# Allegro board MB1167.brd
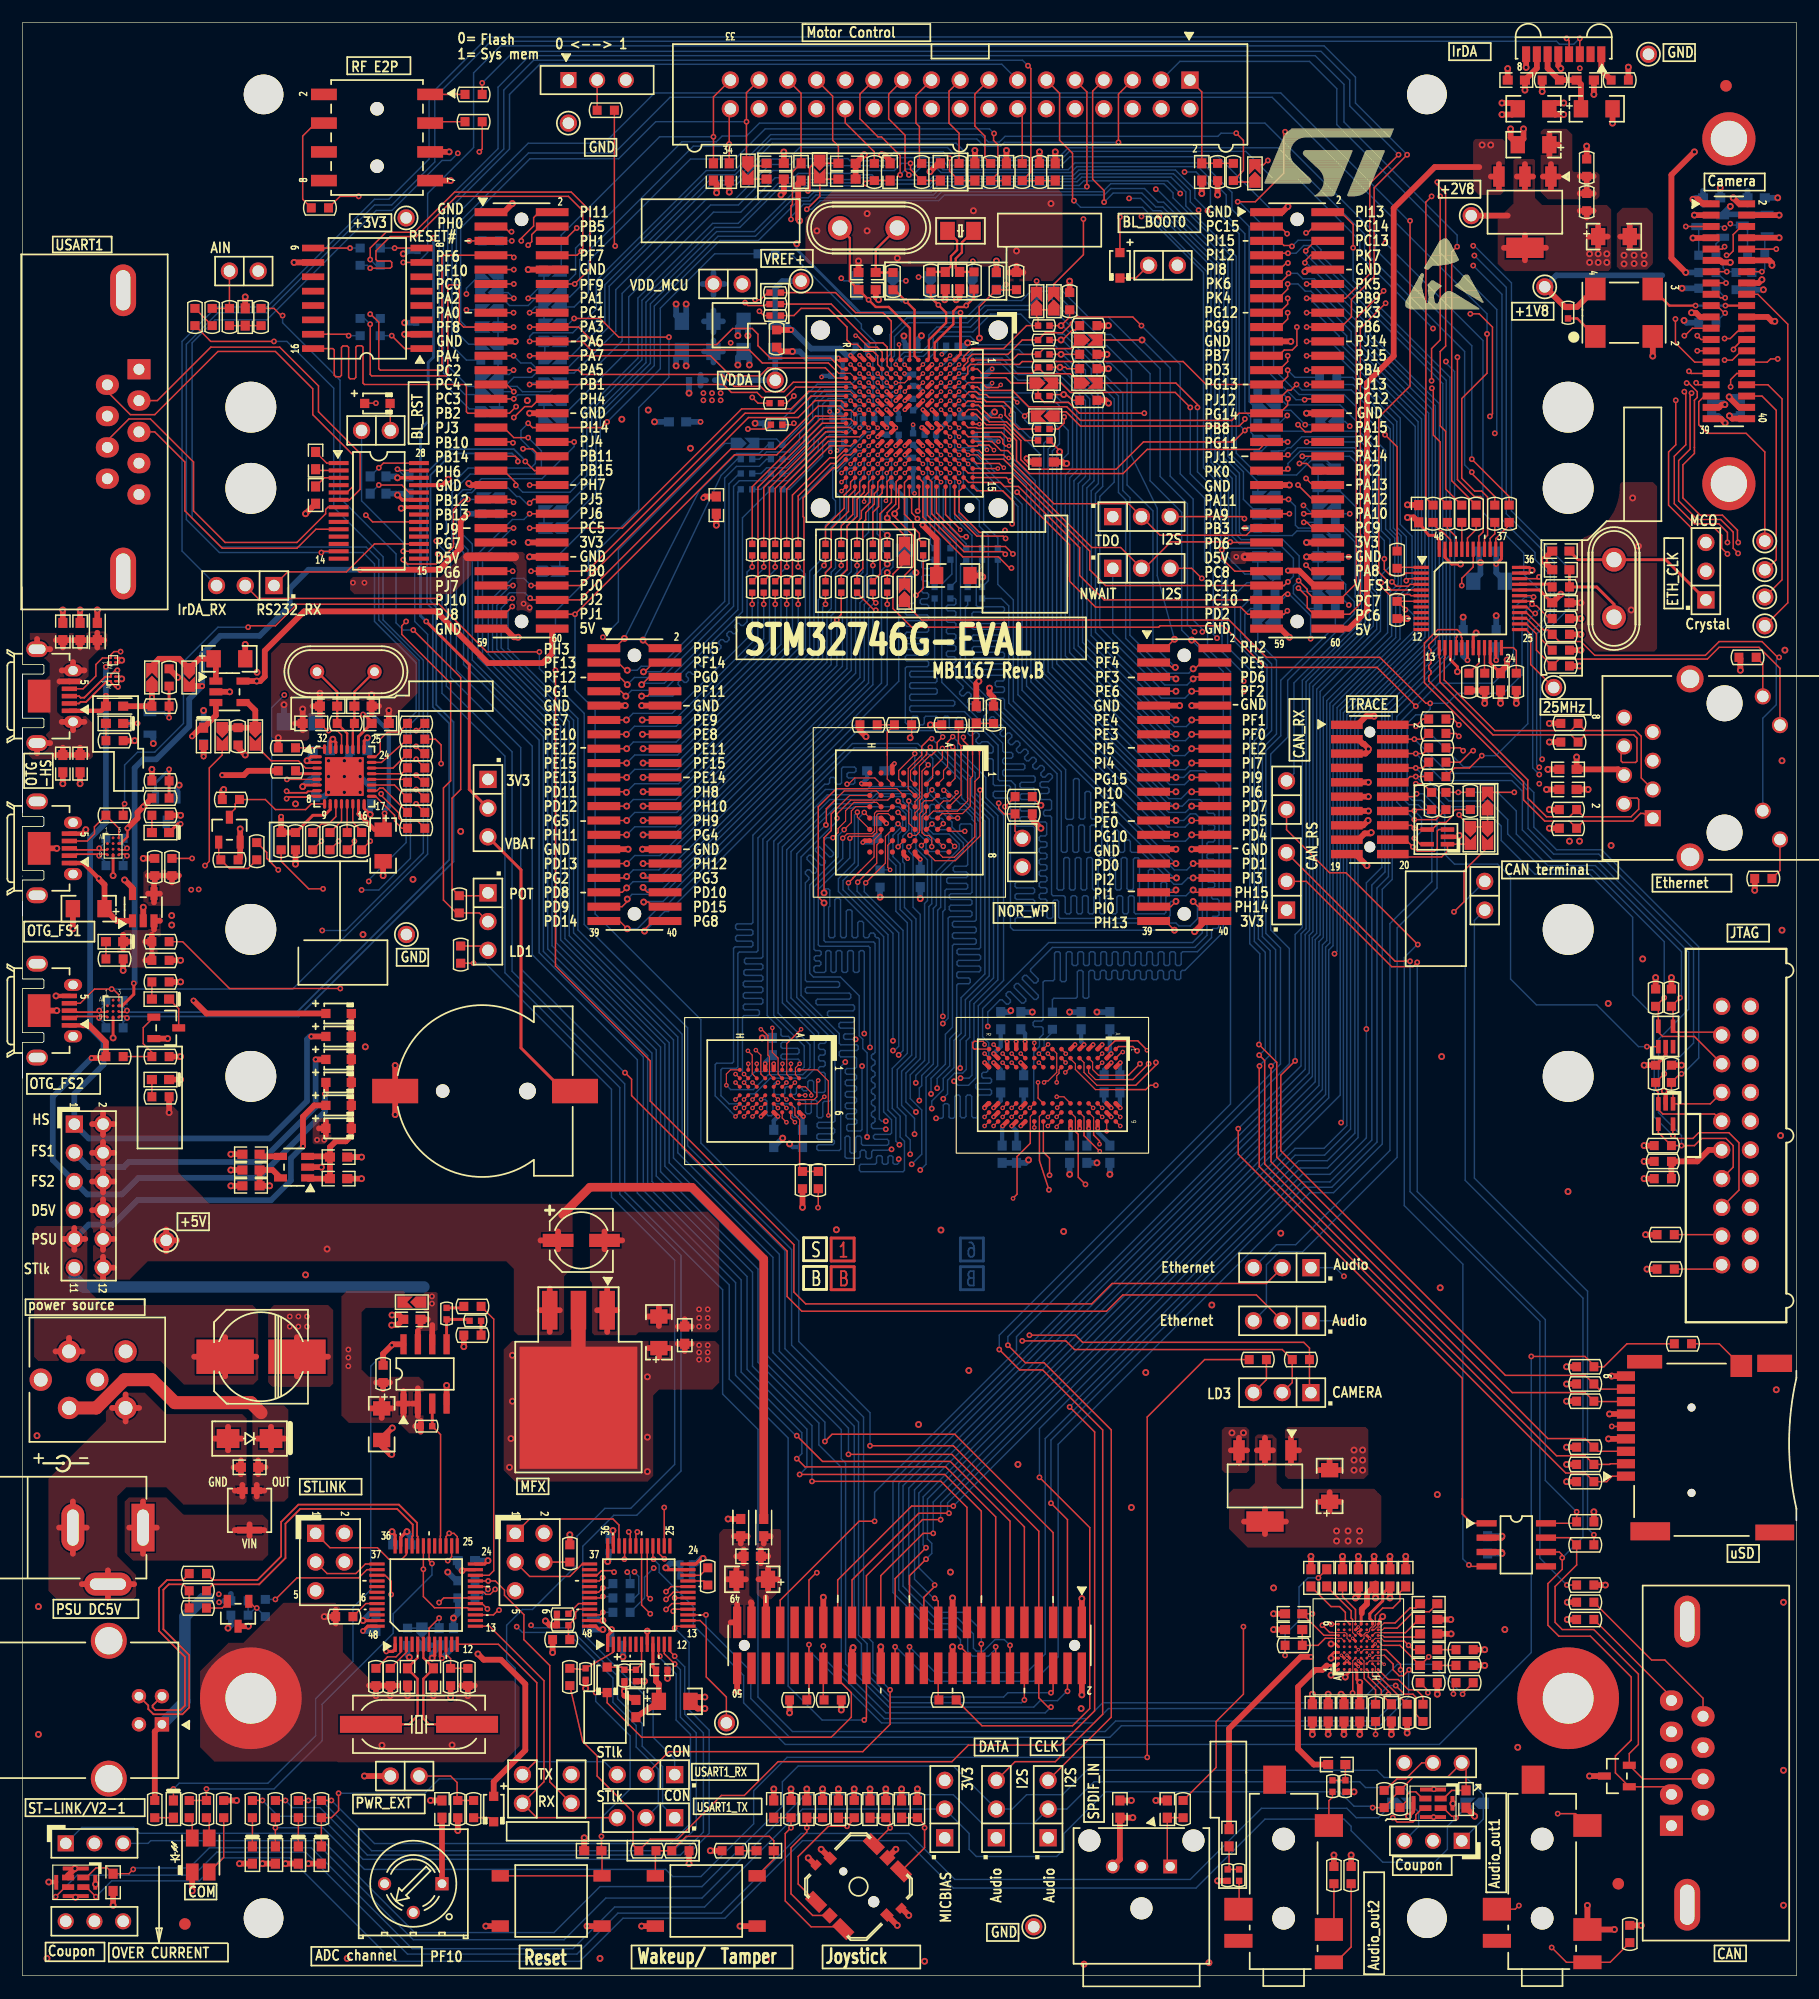
[diagram p0: board, top side]
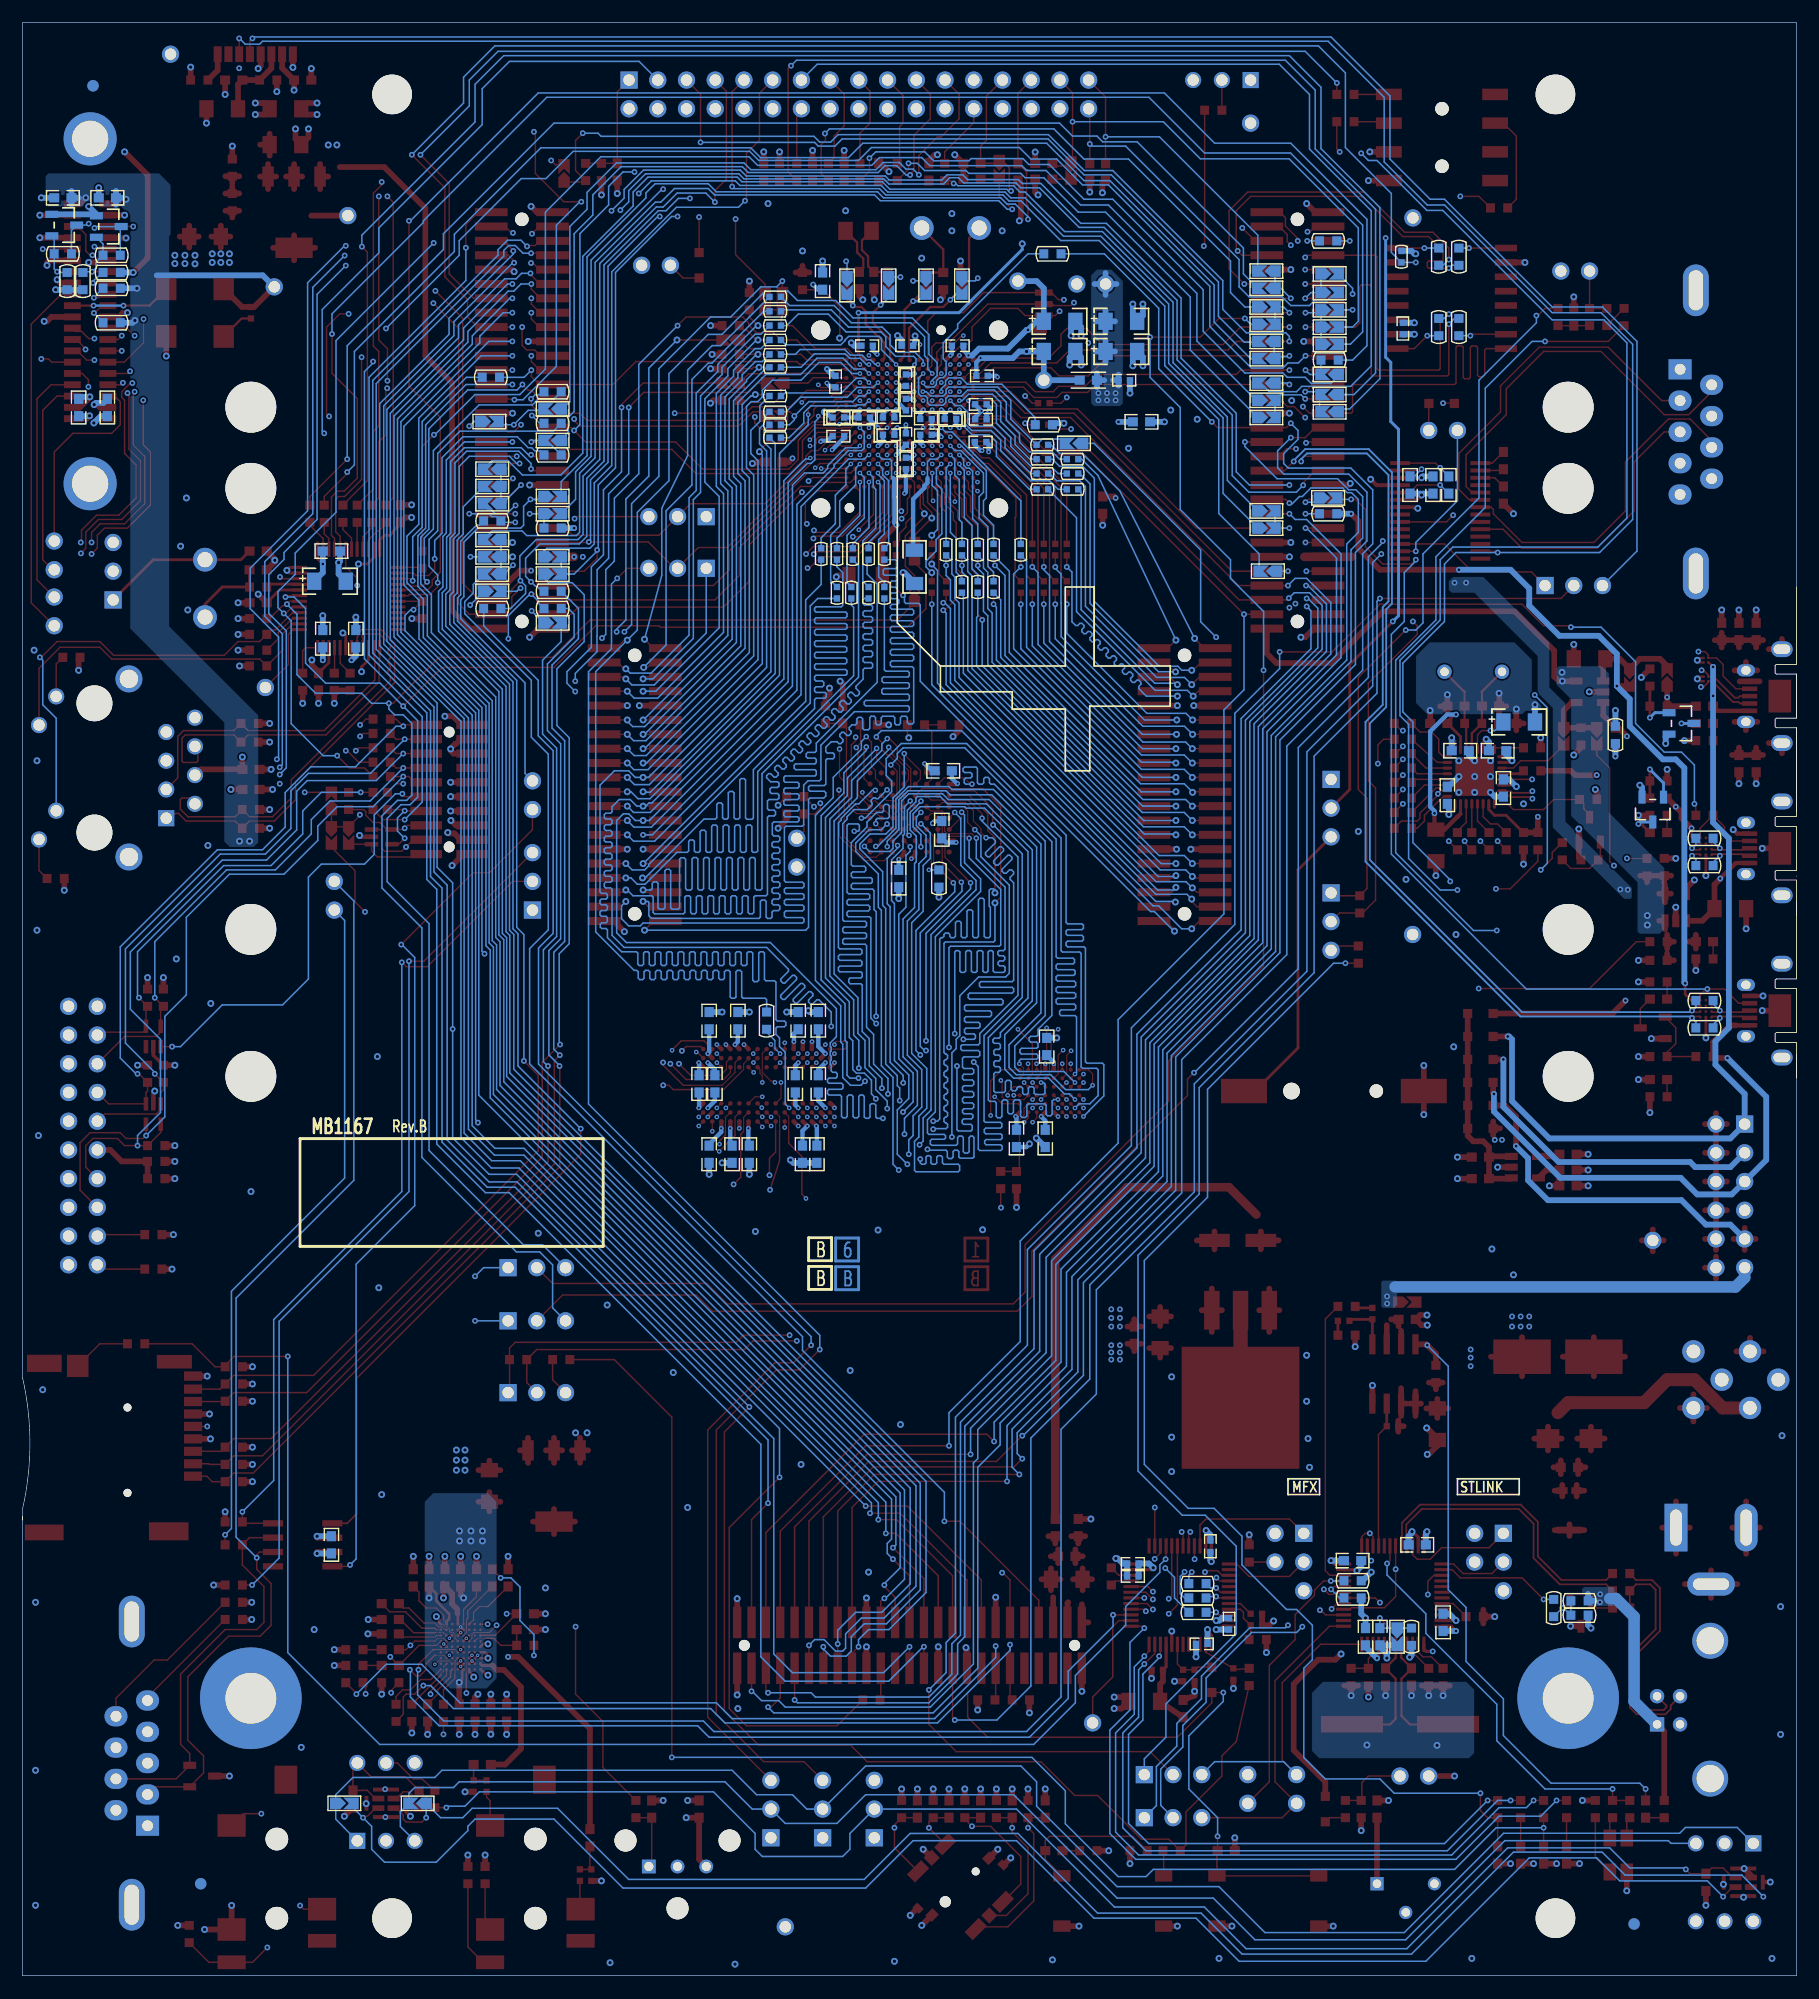
[diagram p1: board, bottom side, seen from below]

Outline 156.84 x 172.72 mm; copper layers: TOP, L2_GND, L3_VCC, L4_SIG, L5_GND, BOTTOM. Coordinates in mm from the lower left corner of the outline.
Outline path: 0,115.14 0,111.25 ; 0,110.36 0,102.87 ; 0,97.26 0,97.21 ; 0,172.72 156.84,172.72 156.84,52.86 arc(156.2,47.08) 156.84,41.3 156.84,40.28 156.84,40.59 156.84,0 0,0 0,81.53 0,79.38 0,82.54 1.79,82.54 1.89,82.64 1.89,83.29 1.79,83.39 0,83.39 0,87.29 1.79,87.29 1.89,87.39 1.89,88.04 1.79,88.14 0,88.14 0,95 0,93.73 0,96.89 1.79,96.89 1.89,96.99 1.89,97.64 1.79,97.75 0,97.75 0,101.64 1.79,101.64 1.89,101.75 1.89,102.4 1.79,102.5 0,102.5 0,109.35 0,107.19 0,110.36 1.79,110.36 1.89,110.46 1.89,111.11 1.79,111.21 0,111.21 0,115.11 1.79,115.11 1.89,115.21 1.89,115.86 1.79,115.96 0,115.96 0,172.72

## Design rules (mm)
net group A0: nets A0 NETR242_1
net group A1: nets A1 NETR240_1
net group A2: nets A2 NETR239_1
net group A3: nets A3 NETR236_1
net group A4: nets A4 NETR233_1
net group A5: nets A5 NETR232_1
net group A6: nets A6 NETR255_1
net group A7: nets A7 NETR253_1
net group A8: nets A8 NETR256_1
net group A9: nets A9 NETR266_1
net group A10: nets A10 NETR258_1
net group A11: nets A11 NETR257_1
net group A12: nets A12 NETR272_1
net group A13: nets A13 NETR262_1
net group A14: nets A14 NETR273_1
net group A15: nets A15 NETR264_1
net group A16: nets A16 NETR265_2
net group A17: nets A17 NETR274_1
net group A18: nets A18 NETR263_1
net group A19: nets A19 NETR37_1
net group A20: nets A20 NETR35_1
net group A21: nets A21 NETR31_1
net group A22: nets A22 NETR34_1
net group BOOT0: nets BOOT0 NETR4_2
net group D0: nets D0 NETR72_1
net group D1: nets D1 NETR60_1
net group D2: nets D2 NETR267_1
net group D3: nets D3 NETR276_1
net group D4: nets D4 NETR63_1
net group D5: nets D5 NETR53_1
net group D6: nets D6 NETR52_1
net group D7: nets D7 NETR64_1
net group D8: nets D8 NETR54_1
net group D9: nets D9 NETR65_1
net group D10: nets D10 NETR67_1
net group D11: nets D11 NETR55_1
net group D12: nets D12 NETR66_1
net group D13: nets D13 NETR59_1
net group D14: nets D14 NETR70_1
net group D15: nets D15 NETR71_1
net group D16: nets D16 NETR56_2
net group D17: nets D17 NETR57_2
net group D18: nets D18 NETR68_2
net group D19: nets D19 NETR69_2
net group D20: nets D20 NETR58_2
net group D21: nets D21 NETR271_2
net group D22: nets D22 NETR279_2
net group D23: nets D23 NETR278_2
net group D24: nets D24 NETR270_2
net group D25: nets D25 NETR269_2
net group D26: nets D26 NETR268_2
net group D27: nets D27 NETR277_2
net group D28: nets D28 NETR250_2
net group D29: nets D29 NETR245_2
net group D30: nets D30 NETR246_2
net group D31: nets D31 NETR248_2
net group DIFFPAIR1: nets NETCN9_2 NETCN9_3
net group NETC11_1: nets NETC11_1 NETCN1_26
net group NETC12_2: nets NETC12_2 NETCN1_19
net group NETC13_2: nets NETC13_2 NETCN1_17
net group NETC14_2: nets NETC14_2 NETCN1_15
net group NETC15_1: nets NETC15_1 NETCN1_14
net group NETC16_2: nets NETC16_2 PA6
net group NETC20_1: nets NETC20_1 PH0
net group NETC21_1: nets NETC21_1 PC15
net group NETC22_1: nets NETC22_1 PC14
net group NETC25_1: nets NETC25_1 NETC25_2
net group NETC31_2: nets NETC31_2 NETR73_1
net group NETC38_1: nets NETC38_1 NETC39_1
net group NETC71_1: nets NETC71_1 NETC71_2
net group NETC76_1: nets NETC76_1 NETC76_2
net group NETC77_1: nets NETC77_1 NETC77_2
net group NETC97_1: nets NETC97_1 PG12
net group NETC136_1: nets NETC136_1 NETC136_2
net group NETCN12_2: nets NETCN12_2 PA13
net group NETCN12_4: nets NETCN12_4 PA14
net group NETCN12_8: nets NETCN12_8 PA15
net group NETCN13_2: nets NETCN13_2 PA11
net group NETCN13_3: nets NETCN13_3 NETD5_C3
net group NETCN13_4: nets NETCN13_4 PA10
net group NETCN14_3: nets NETCN14_3 PB15
net group NETCN16_2: nets NETCN16_2 PAR_D4
net group NETCN16_8: nets NETCN16_8 PAR_D3
net group NETCN16_10: nets NETCN16_10 NETR154_1
net group NETCN20_22: nets NETCN20_22 PK7
net group NETCN21_2: nets NETCN21_2 STL_USB_DM
net group NETCN22_7: nets NETCN22_7 NETJP12_1
net group NETD15_2: nets NETD15_2 NETJP15_2
net group NETJP19_3: nets NETJP19_3 PAR_D1
net group NETLD1_2: nets NETLD1_2 NETR207_1
net group NETLD2_2: nets NETLD2_2 NETR206_1
net group NETLD3_2: nets NETLD3_2 NETR205_1
net group NETLD4_2: nets NETLD4_2 NETR204_1
net group NETLD6_2: nets NETLD6_2 NETR121_1
net group NETR42_1: nets NETR42_1 PB2
net group NETR43_1: nets NETR43_1 PB6
net group NETR44_1: nets NETR44_1 PG15
net group NETR45_1: nets NETR45_1 PH7
net group NETR46_1: nets NETR46_1 NETR46_2
net group NETR47_1: nets NETR47_1 NETR47_2
net group NETR48_1: nets NETR48_1 NETR48_2
net group NETR49_1: nets NETR49_1 NETR49_2
net group NETR50_1: nets NETR50_1 NETR50_2
net group NETR51_1: nets NETR51_1 PF11
net group NETR61_1: nets NETR61_1 PG8
net group NETR62_1: nets NETR62_1 NETR62_2
net group NETR88_1: nets NETR88_1 PA3
net group NETR90_1: nets NETR90_1 PD7
net group NETR95_1: nets NETR95_1 PB0
net group NETR100_1: nets NETR100_1 PB1
net group NETR102_1: nets NETR102_1 PB10
net group NETR106_1: nets NETR106_1 PB11
net group NETR107_1: nets NETR107_1 PD5
net group NETR109_1: nets NETR109_1 PB12
net group NETR119_1: nets NETR119_1 PB5
net group NETR123_1: nets NETR123_1 PH4
net group NETR124_1: nets NETR124_1 PI11
net group NETR125_1: nets NETR125_1 PC0
net group NETR126_1: nets NETR126_1 PA5
net group NETR146_1: nets NETR146_1 PG10
net group NETR193_1: nets NETR193_1 PG9
net group NETR225_2: nets NETR225_2 PI14
net group NETR241_2: nets NETR241_2 PC2
net group NETR243_2: nets NETR243_2 PG13
net group NETR244_2: nets NETR244_2 PG14
net group NETR251_2: nets NETR251_2 PH3
net group NETR252_2: nets NETR252_2 PG11
net group NETR254_2: nets NETR254_2 PH5
net group NETR287_1: nets NETR287_1 PH2
net group NETR295_2: nets NETR295_2 PI8
net group VDDA: nets VDDA VREF+
net group +1V8: nets NETR25_1
net group +2V8: nets I2C1_SCL_C I2C1_SDA_C NETCN2_3 NETR195_2 NETR290_2 PB8
net group +3V3_ST_LINK: nets +3V3_ST_LINK NETLD12_4 STM_RST
net group +5V: nets NETLD10_1
net group A23: nets A23 NETR39_1 NETR247_1
net group ADDRESS: nets NETR285_1
net group CUR_SEL: nets CUR_SEL NETR150_2 NETR151_2 NETR152_1
net group DATA: nets PE0 PE1 PI4 PI5
net group LED_STLINK: nets LED_STLINK NETLD12_2 NETLD12_3
net group MIC_VDD: nets MIC_VDD NETCN24_5 NETR199_1
net group NETB2_2: nets NETB2_2 NETR180_1 PC13
net group NETC24_2: nets NETC24_2 NETCN3_1 NETJP24_1 NETR27_1 NETR27_2
net group NETC64_1: nets NETC64_1 NETC64_2 NETC74_2
net group NETC88_1: nets NETC88_1 NETC88_2 NETCN25_6
net group NETC98_1: nets NETC98_1 NETC98_2 NETCN25_4
net group NETCN2_1: nets NETCN2_1 NETR189_2 NETR291_2 PB9
net group NETCN12_10: nets NETCN5_5 NETCN12_10 NETR127_1 RESET#
net group NETCN12_14: nets NETCN12_6 NETCN12_14 T_JTDO
net group NETCN12_16: nets NETCN12_16 NETCN15_3 PB4
net group NETCN14_2: nets NETCN14_2
net group NETCN16_1: nets NETCN2_4 NETCN16_1 PAR_D8
net group NETCN21_3: nets NETCN21_3 NETR171_2 STL_USB_DP
net group NETL2_1: nets NETL2_1 NETR80_2 NETR103_1
net group NETLD8_2: nets NETR132_1
net group NETLD11_2: nets NETLD11_2 NETR293_1 PWR_ENN USB_RENUMN VUSB_ST_LINK
net group NETR105_2: nets NETR105_2 PA9 VBUS_FS1
net group NETR115_1: nets NETR115_1 NETR138_2 PB13 VBUS_FS2
net group NETR129_2: nets NETR130_2
net group NETR227_1: nets NETR26_1 NETR227_1 PF9
net group NETR228_2: nets NETR22_1 NETR228_2 PF7
net group NETR237_1: nets NETR24_1 NETR237_1 PF6
net group NETR238_2: nets NETR41_1 NETR238_2 PF8

## Placement (name value [footprint] x y rotation side)
B1  TD-0341 [RESET_Black]  [PB10]  46.74 6.6 0 top
B2  WKUP_TAMPER  [PB10]  60.45 6.6 0 top
B3  EVQQ7  [SW-JOY]  73.91 7.87 45 top
BT1  CR1220 holder  [BAT_2SM_CR1220]  40.89 78.23 180 top
C1  100nF  [0603C]  132.08 167.64 180 top
C2  100nF  [0603C]  138.18 167.64 0 top
C3  4.7uF  [TAN-A]  133.6 165.1 0 top
C4  4.7uF  [TAN-A]  139.19 165.1 180 top
C5  10uF  [TAN-A]  133.6 161.93 0 top
C6  [N_A]  [0603C]  66.55 160.27 180 top
C7  [N_A]  [0603C]  72.9 160.27 180 top
C8  [N_A]  [0603C]  61.09 159.51 90 top
C9  [N_A]  [0603C]  62.48 159.51 90 top
C10  [N_A]  [0603C]  68.83 159.51 90 top
C11  100nF  [0603C]  76.71 159.51 90 top
C12  [N_A]  [0603C]  81.15 159.51 270 top
C13  [N_A]  [0603C]  84.2 159.51 270 top
C14  [N_A]  [0603C]  87 159.51 270 top
C15  100nF  [0603C]  91.31 159.51 90 top
C16  1nF  [0603C]  104.27 159.51 90 top
C17  10nF  [0603C]  66.55 158.88 0 top
C18  [N_A]  [0603C]  72.9 158.88 180 top
C19  10uF  [TAN-A]  140.72 153.8 180 top
C20  20pF  [0603C]  74.68 150.62 180 top
C21  1.5pF  [0603C]  81.58 149.91 270 top
C22  1.5pF  [0603C]  82.85 149.91 270 top
C23  20pF  [0603C]  74.68 149.1 0 top
C24  [N_A]  [0603C]  19.68 146.69 270 top
C25  100nF  [0603C]  25.91 133.99 270 top
C26  [N_A]  [0603C]  90.42 133.86 180 top
C27  100nF  [0603C]  25.91 130.94 90 top
C28  [N_A]  [0603C]  61.34 130.05 90 top
C29  100nF  [0603C]  123.44 129.29 90 top
C30  22pF  [0603C]  136.02 125.98 180 top
C31  22pF  [0603C]  136.02 124.33 0 top
C32  2.2uF  [1206C]  82.3 123.83 0 top
C33  100nF  [0603C]  136.02 121.41 180 top
C34  100nF  [0603C]  3.56 118.87 90 top
C35  100nF  [0603C]  5.08 118.87 90 top
C36  4.7uF  [TAN-A]  18.29 116.46 180 top
C37  100nF  [0603C]  130.68 114.43 90 top
C38  33pF  [0603C]  27.05 112.27 180 top
C39  33pF  [0603C]  30.1 112.27 0 top
C40  100nF  [0603C]  84.33 111.51 90 top
C41  100nF  [0603C]  25.53 110.74 180 top
C42  100nF  [0603C]  31.62 110.74 0 top
C43  100nF  [0603C]  3.56 107.19 270 top
C44  100nF  [0603C]  5.08 107.19 270 top
C45  100nF  [0603C]  136.65 106.68 0 top
C46  100nF  [0603C]  136.65 104.9 0 top
C47  4.7uF  [TAN-A]  31.88 99.95 90 top
C48  4.7uF  [TAN-A]  5.84 94.36 0 top
C49  10nF_X7R_0603  [0603C]  20.19 72.64 0 top
C50  1uF_X5R_0603  [0603C]  27.94 72.39 180 top
C51  100nF  [0603C]  20.19 71.25 0 top
C52  100nF  [0603C]  27.94 70.48 180 top
C53  1uF_X5R_0603  [0603C]  20.19 69.85 180 top
C54  47uF  [CAE_5R3X5R3_H5R4]  49.4 65.02 0 top
C55  100nF  [0603C]  34.42 58.04 0 top
C56  10uF  [TAN-A]  56.26 56.9 270 top
C57  100nF  [0603C]  58.55 56.64 90 top
C58  220uF  [C310M-6]  21.08 54.74 180 top
C59  4.7uF  [TAN-A]  31.75 48.77 90 top
C60  100nF  [0603C]  20.07 44.96 180 top
C61  10uF  [TAN-A]  115.57 43.31 270 top
C62  100nF  [0603C]  64.52 37.08 180 top
C63  4.7uF  [0603C]  113.92 35.18 270 top
C64  1uF  [0603C]  115.32 35.18 90 top
C65  4.7uF  [0603C]  116.71 35.18 90 top
C66  4.7uF  [0603C]  118.11 35.18 90 top
C67  1uF  [0603C]  119.51 35.18 90 top
C68  100nF  [0603C]  120.9 35.18 90 top
C69  1uF  [0603C]  122.3 35.18 90 top
C70  10uF  [TAN-A]  64.52 35.05 0 top
C71  2.2uF  [0603C]  124.33 32.89 180 top
C72  4.7uF  [0603C]  112.39 32 0 top
C73  2.2uF  [0603C]  124.33 31.5 0 top
C74  4.7uF  [0603C]  112.39 30.61 0 top
C75  2.2uF  [0603C]  124.33 30.23 0 top
C76  100nF  [0603C]  124.33 28.83 0 top
C77  100nF  [0603C]  124.33 27.43 0 top
C78  100nF  [0402C]  56.52 27.05 180 top
C79  100nF[N_A]  [0402C]  54.23 26.54 90 top
C80  20pF  [0603C]  34.04 26.42 270 top
C81  20pF  [0603C]  36.32 26.42 270 top
C82  1uF  [TAN-A]  57.66 24.26 180 top
C83  100nF  [0603C]  114.05 23.24 270 top
C84  100nF  [0603C]  115.44 23.24 270 top
C85  4.7uF  [0603C]  116.84 23.24 270 top
C86  100nF  [0603C]  118.24 23.24 270 top
C87  1uF  [0603C]  121.03 23.24 270 top
C88  4.7uF  [0603C]  116.2 18.67 180 top
C89  100nF  [0603C]  127.64 15.62 270 top
C90  100nF  [0603C]  37.08 14.73 90 top
C91  10nF[N_A]  [0603C]  66.42 14.73 270 top
C92  10nF[N_A]  [0603C]  69.34 14.73 270 top
C93  10nF[N_A]  [0603C]  72.14 14.73 270 top
C94  10nF[N_A]  [0603C]  74.93 14.73 270 top
C95  10nF[N_A]  [0603C]  77.72 14.73 270 top
C96  100nF  [0603C]  97.03 14.73 270 top
C97  30pF  [0603C]  101.22 14.73 90 top
C98  4.7uF  [0603C]  106.68 12.19 90 top
C99  100nF  [0603C]  50.42 11.05 0 top
C100  [N_A]  [0603C]  65.66 11.05 0 top
C101  100nF  [0603C]  8 8.26 270 top
C102  100nF  [0603C]  153.29 157.23 0 bottom
C103  100nF  [0603C]  149.35 157.23 180 bottom
C104  [N_A]  [0603C]  86.11 149.86 270 bottom
C105  1uF  [TAN-A]  65.15 146.3 0 bottom
C106  4.7uF  [TAN-A]  59.69 146.3 0 bottom
C107  100nF  [0402C]  34.8 145.67 90 bottom
C108  100nF  [0402C]  82.17 144.15 0 bottom
C109  100nF  [0402C]  78.61 144.15 0 bottom
C110  100nF  [0402C]  74.17 144.15 180 bottom
C111  1uF  [TAN-A]  65.15 143.64 0 bottom
C112  4.7uF  [TAN-A]  59.69 143.64 0 bottom
C113  100nF  [0402C]  72.01 141.48 0 bottom
C114  100nF  [0402C]  78.74 141.1 90 bottom
C115  100nF  [0402C]  59.44 141.1 180 bottom
C116  100nF  [0402C]  84.96 140.97 90 bottom
C117  100nF  [0402C]  72.11 138.96 180 bottom
C118  100nF  [0402C]  78.74 138.94 270 bottom
C119  100nF  [0603C]  151.89 138.68 90 bottom
C120  100nF  [0603C]  149.35 138.68 90 bottom
C121  100nF  [0402C]  84.71 137.79 180 bottom
C122  100nF  [0402C]  82.42 137.79 0 bottom
C123  100nF  [0402C]  80.26 137.79 180 bottom
C124  100nF  [0402C]  76.96 137.67 0 bottom
C125  100nF  [0402C]  74.8 137.67 180 bottom
C126  100nF  [0402C]  72.11 137.64 180 bottom
C127  [N_A]  [0603C]  57.91 137.41 0 bottom
C128  100nF  [0402C]  80.26 136.27 180 bottom
C129  100nF  [0402C]  76.96 136.27 0 bottom
C130  100nF  [0402C]  84.71 136.14 180 bottom
C131  100nF  [0402C]  78.74 135.89 90 bottom
C132  100nF  [0402C]  72.14 135.64 180 bottom
C133  100nF  [0402C]  78.74 133.73 270 bottom
C134  100nF  [0603C]  34.16 131.83 90 bottom
C135  100nF  [0603C]  32.13 131.83 270 bottom
C136  100nF  [0603C]  30.73 131.83 90 bottom
C137  100nF  [0603C]  129.54 125.98 0 bottom
C138  2.2uF  [1206C]  77.98 124.59 270 bottom
C139  10uF  [TAN-A]  129.67 123.32 0 bottom
C140  100nF  [0603C]  130.3 118.24 90 bottom
C141  100nF  [0603C]  127.38 118.24 270 bottom
C142  4.7uF  [TAN-A]  24.51 110.87 0 bottom
C143  100nF  [0603C]  29.72 108.33 180 bottom
C144  100nF  [0603C]  26.42 108.33 180 bottom
C145  100nF  [0603C]  75.44 106.55 180 bottom
C146  100nF  [0603C]  25.91 105.03 270 bottom
C147  100nF  [0603C]  30.86 104.39 90 bottom
C148  100nF  [0603C]  75.56 101.35 270 bottom
C149  100nF  [0603C]  79.38 97.03 270 bottom
C150  100nF  [0603C]  96.14 84.45 90 bottom
C151  100nF  [0603C]  93.6 84.45 90 bottom
C152  100nF  [0603C]  88.27 84.45 90 bottom
C153  100nF  [0603C]  86.49 84.45 90 bottom
C154  100nF  [0603C]  66.29 82.17 90 bottom
C155  100nF  [0603C]  97.03 78.87 90 bottom
C156  100nF  [0603C]  95.63 78.87 90 bottom
C157  100nF  [0603C]  88.52 78.87 90 bottom
C158  100nF  [0603C]  86.49 78.87 90 bottom
C159  100nF  [0603C]  68.96 74.04 270 bottom
C160  100nF  [0603C]  66.42 74.04 270 bottom
C161  100nF  [0603C]  96.14 72.64 270 bottom
C162  100nF  [0603C]  94.11 72.64 270 bottom
C163  100nF  [0603C]  92.58 72.64 270 bottom
C164  100nF  [0603C]  87.88 72.64 270 bottom
C165  100nF  [0603C]  86.61 72.64 270 bottom
C166  100nF  [0603C]  129.54 38.1 90 bottom
C167  100nF  [0603C]  33.53 38.1 180 bottom
C168  100nF  [0402C]  51.82 37.97 270 bottom
C169  100nF  [0603C]  39.24 36.7 0 bottom
C170  100nF  [0402C]  58.67 36.45 180 bottom
C171  100nF  [0402C]  58.67 35.31 0 bottom
C172  100nF  [0603C]  31.24 31.24 270 bottom
C173  100nF  [0402C]  50.16 31.11 270 bottom
C174  100nF  [0603C]  38.1 29.97 270 bottom
C175  100nF  [0603C]  36.83 29.97 90 bottom
C176  100nF  [0402C]  52.58 29.34 180 bottom
CN1  MC_connector  [IDC34S]  103.22 167.64 270 top
CN2  F206A-2_04MGF-A  [SSM-104-L-DH]  31.34 162.56 90 top
CN3  -  [SIP2]  18.29 150.75 0 top
CN4  F1000-2_20MGF-L0A  [CLM-120-02-L-D]  150.88 147.19 270 top
CN5  P1039-2_30MGF-089-1A  [FTR-130-53-L-D-LC]  44.12 137.54 270 top
CN6  P1039-2_30MGF-089-1A  [FTR-130-53-L-D-LC]  112.7 137.54 270 top
CN7  DB9-male USART1  [DB9_M]  10.29 136.53 90 top
CN8  475900001  [MOLEX_47590001]  4.14 113.16 270 top
CN9  J0011D21B  [RJ45_J0011D01BNL]  144.15 102.36 270 top
CN10  P1039-2_20MGF-089-1A  [FTR-120-53-L-D-LC]  54.1 105.33 270 top
CN11  P1039-2_20MGF-089-1A  [FTR-120-53-L-D-LC]  102.72 105.33 270 top
CN12  P127B-2_10MGF-079-1E7A  [FTSH-110-01-L-DV]  119.13 104.9 270 top
CN13  475900001  [MOLEX_47590001]  4.14 99.69 270 top
CN14  475900001  [MOLEX_47590001]  4.14 85.34 270 top
CN15  JTAG  [IDC20S]  150.24 85.72 0 top
CN16  PJS008-2000  [MSD_PJS008_]  147.57 42.7 90 top
CN17  DC-10B  [PWR_JACK_DC10]  10.64 39.62 0 top
CN18  [N_A]  [HDR_2X3-1_2R54-6]  25.91 39.12 270 top
CN19  [N_A]  [HDR_2X3-1_2R54-6]  43.56 39.12 270 top
CN20  P127B-2_25MGF-079-1A  [FTSH-125-01-F-DV]  78.42 29.21 180 top
CN21  USB-typeB connector  [USB-B]  12.32 22.23 270 top
CN22  DB9-male CAN connector  [DB9_M]  145.8 18.8 270 top
CN23  -  [SIP2]  44.2 15.24 90 top
CN24  Coupon Connectors  [COUPON]  124.71 15.37 90 top
CN25  PJ3028B-3  [PJ3028B]  111.51 5.08 90 top
CN26  PJ3028B-3  [PJ3028B]  134.37 5.08 90 top
CN27  Coupon Connectors  [COUPON]  6.35 8.26 270 top
CN28  DLR11H0  [CONN_DLR11H0]  101.47 9.65 0 top
D1  BAT60JFILM  [SOD-323]  97.03 151.26 270 top
D2  BAT60JFILM  [SOD-323]  31.37 139.04 0 top
D3  ESDA14V2-2BF3  [BGA4_0R4_0R8X0R8]  8 116.33 90 top
D4  USBULC6-2F3  [BGA4_0R4_1X1]  8 114.68 90 top
D5  EMIF02-USB03F2  [BGA11_0R5_1R57X2R07]  8 99.87 0 top
D6  EMIF02-USB03F2  [BGA11_0R5_1R57X2R07]  8 85.52 0 top
D7  BAT60JFILM  [SOD-323]  27.94 85.09 0 top
D8  BAT60JFILM  [SOD-323]  27.94 83.06 0 top
D9  BAT60JFILM  [SOD-323]  27.94 81.03 0 top
D10  BAT60JFILM  [SOD-323]  27.94 78.99 0 top
D11  BAT60JFILM  [SOD-323]  27.94 76.96 0 top
D12  BAT60JFILM  [SOD-323]  27.94 74.93 0 top
D13  ZEN056V130A24LS  [TYCO_ZEN056V130A24LS]  20.07 41.15 90 top
D14  ESDCAN24-2BLY  [SOT-23]  140.97 17.65 90 top
D15  BAT60JFILM  [SOD-323]  41.66 14.73 270 top
D16  BAT60JFILM  [SOD-323]  51.69 26.16 270 top
H1  POSITION HOLE  [HOLE_C9D4R5]  20.18 24.53 0 top
H2  POSITION HOLE  [HOLE_C9D4R5]  136.66 24.53 0 top
JP1  -  [SIP2]  99.57 151.26 0 top
JP2  -  [SIP2]  63.63 149.61 180 top
JP3  -  [SIP2]  32.51 136.65 180 top
JP4  -  [SIP3]  96.39 129.03 0 top
JP5  -  [SIP3]  96.39 124.46 0 top
JP6  -  [SIP3]  148.84 121.67 90 top
JP7  -  [SIP3]  22.23 122.94 180 top
JP8  -  [SIP2]  111.76 105.66 270 top
JP9  -  [SIP3]  41.15 105.79 270 top
JP10  -  [SIP2]  88.39 98.04 90 top
JP11  -  [SIP3]  111.76 94.23 90 top
JP12  -  [SIP2]  129.29 94.23 90 top
JP13  Header 6X2  [HDR_2X6_2R54]  4.57 75.31 270 top
JP14  -  [SIP3]  57.66 17.78 180 top
JP15  -  [SIP2]  32.51 17.65 0 top
JP16  [N_A]  [SIP2]  48.51 17.78 270 top
JP17  -  [SIP3]  81.53 12.19 90 top
JP18  -  [SIP3]  86.11 12.19 90 top
JP19  -  [SIP3]  90.68 12.19 90 top
JP20  -  [SIP3]  57.66 13.97 180 top
JP21  -  [SIP3]  113.92 57.91 180 top
JP22  -  [SIP3]  113.92 62.61 180 top
JP23  -  [SIP3]  113.92 51.56 180 top
JP24  -  [SIP3]  41.15 95.76 270 top
L1  EXC-3BP121H[BEAD]  [0603L]  6.6 118.87 270 top
L2  EXC-3BP121H[BEAD]  [0603L]  8.13 112.27 180 top
L3  BNX002-01  [BNX001]  6.6 52.7 180 top
L4  BEAD(FCM1608KF-601T03)  [0603L]  63.5 39.62 270 top
L5  BEAD(FCM1608KF-601T03)  [0603L]  65.53 39.62 270 top
L6  Ferrite  [0603L]  54.23 23.62 270 top
L7  BEAD(FCM1608KF-601T03)  [0603L]  62.61 141.1 0 bottom
LD1  Green  [0603D]  26.42 10.67 90 top
LD2  Orange  [0603D]  24.38 10.67 90 top
LD3  Red  [0603D]  22.35 10.67 90 top
LD4  Blue  [0603D]  20.32 10.67 90 top
LD5  Green  [0603D]  8.13 110.74 0 top
LD6  Red  [0603D]  16 109.6 90 top
LD7  Green  [0603D]  12.19 101.09 0 top
LD8  Red  [0603D]  8.13 91.44 0 top
LD9  Green  [0603D]  12.19 86.36 0 top
LD10  red  [0603D]  12.19 79.25 0 top
LD11  Red  [0603D]  13.34 14.73 90 top
LD12  HSMF-A201-A00J1  [LED2_3528]  15.75 10.67 0 top
NOREF  -  []  450.6 -120.4 0 top
NOREF#2  -  [unnamed#2]  20.18 79.53 0 top
NOREF#3  -  [unnamed#2]  20.18 92.53 0 top
NOREF#4  -  [unnamed#2]  136.66 138.71 0 top
NOREF#5  -  [unnamed#2]  150.62 167.13 0 top
NOREF#6  -  [unnamed#2]  20.18 131.53 0 top
NOREF#7  -  [unnamed#2]  124.18 5.08 0 top
NOREF#8  -  [unnamed#2]  14.35 4.57 0 top
NOREF#9  -  []  0 0 0 top
NOREF#10  -  []  283.34 118.87 0 top
NOREF#11  -  [unnamed#2]  141.1 8.13 0 top
NOREF#12  -  []  322.2 176.15 0 top
NOREF#13  -  [unnamed#2]  136.66 79.53 0 top
NOREF#14  -  [unnamed#2]  21.31 166.37 0 top
NOREF#15  -  []  13.59 -41.66 0 top
NOREF#16  -  [unnamed#2]  20.18 138.71 0 top
NOREF#17  -  []  12.32 228.5 0 top
NOREF#18  -  []  72.26 63.46 0 top
NOREF#19  -  []  72.26 60.92 0 top
NOREF#20  -  [unnamed#2]  21.31 5.08 0 top
NOREF#21  -  [unnamed#2]  124.18 166.37 0 top
NOREF#22  -  [unnamed#2]  136.66 92.53 0 top
NOREF#23  -  [unnamed#2]  136.66 131.53 0 top
NOREF#24  -  [unnamed#2]  150.62 167.13 180 bottom
NOREF#25  -  [unnamed#2]  141.1 8.13 180 bottom
NOREF#26  -  [unnamed#2]  14.35 4.57 180 bottom
R1  47  [0603R]  135.13 167.64 0 top
R2  5.1  [0603R]  141.22 167.64 180 top
R3  0  [0603R]  39.88 166.37 180 top
R4  10K  [0603R]  51.56 164.97 180 top
R5  0  [0603R]  39.88 163.96 180 top
R6  150  [0603R]  138.3 159.89 90 top
R7  0  [0603R]  75.31 159.51 270 top
R8  0  [0603R]  79.5 159.51 90 top
R9  0  [0603R]  82.8 159.51 90 top
R10  0  [0603R]  85.6 159.51 90 top
R11  0  [0603R]  88.39 159.51 270 top
R12  100K  [0603R]  89.92 159.51 90 top
R13  3K3  [0603R]  105.66 159.51 270 top
R14  [N_A]  [0603R]  107.06 159.51 270 top
R15  120  [0603R]  138.3 156.84 90 top
R16  0  [0603R]  26.29 156.34 0 top
R17  0  [0603R]  80.31 149.91 270 top
R18  0  [0603R]  84.12 149.91 270 top
R19  0  [0603R]  76.96 149.86 90 top
R20  10K  [0603R]  86.11 149.86 90 top
R21  [N_A]  [0603R]  87.88 149.86 90 top
R22  33  [0402R]  66.55 148.84 180 top
R23  220K  [0603R]  92.58 148.08 270 top
R24  33  [0402R]  66.55 147.83 180 top
R25  10K  [0402R]  136.65 147.07 90 top
R26  33  [0402R]  66.55 146.81 180 top
R27  0  [0603R]  15.24 146.69 270 top
R28  47  [0603R]  16.76 146.69 270 top
R29  0  [0603R]  18.29 146.69 90 top
R30  0  [0603R]  21.08 146.69 90 top
R31  33  [0402R]  90.3 145.92 0 top
R32  220K  [0603R]  94.23 145.92 180 top
R33  0  [0603R]  66.67 144.78 90 top
R34  33  [0402R]  90.3 144.65 0 top
R35  33  [0402R]  90.3 143.38 0 top
R36  220K  [0603R]  94.23 143.38 180 top
R37  33  [0402R]  90.3 142.24 0 top
R38  220K  [0603R]  94.23 142.11 180 top
R39  33[N_A]  [0402R]  90.3 139.7 0 top
R40  220K  [0603R]  94.23 139.32 180 top
R41  33  [0402R]  66.55 139.06 180 top
R42  33  [0402R]  66.67 137.16 180 top
R43  33  [0402R]  90.3 136.78 0 top
R44  33  [0402R]  90.3 135.76 0 top
R45  33  [0603R]  124.71 129.29 90 top
R46  33  [0603R]  125.98 129.29 90 top
R47  33  [0603R]  127.25 129.29 90 top
R48  33  [0603R]  128.52 129.29 90 top
R49  33  [0603R]  130.18 129.29 90 top
R50  33  [0603R]  131.44 129.29 90 top
R51  33  [0402R]  64.52 126.11 270 top
R52  33  [0402R]  65.53 126.11 270 top
R53  33  [0402R]  66.55 126.11 270 top
R54  33  [0402R]  67.56 126.11 270 top
R55  33  [0402R]  68.58 126.11 270 top
R56  33  [0402R]  70.99 126.11 90 top
R57  33  [0402R]  72.39 126.11 90 top
R58  33  [0402R]  73.79 126.11 90 top
R59  33  [0402R]  75.18 126.11 270 top
R60  33  [0402R]  76.45 126.11 270 top
R61  33  [0402R]  79.63 126.11 270 top
R62  33  [0603R]  121.54 125.22 90 top
R63  33  [0402R]  64.52 122.81 270 top
R64  33  [0402R]  65.53 122.81 270 top
R65  33  [0402R]  66.55 122.81 270 top
R66  33  [0402R]  67.56 122.81 270 top
R67  33  [0402R]  68.58 122.81 270 top
R68  33  [0402R]  70.99 122.81 90 top
R69  33  [0402R]  72.39 122.81 90 top
R70  33  [0402R]  73.79 122.81 270 top
R71  33  [0402R]  75.18 122.81 270 top
R72  33  [0402R]  76.45 122.81 270 top
R73  0  [0603R]  136.02 122.81 0 top
R74  10K  [0603R]  121.54 120.78 90 top
R75  1K5  [0603R]  136.02 120.02 0 top
R76  2K2  [0603R]  136.02 118.62 0 top
R77  2K2  [0603R]  136.02 117.22 0 top
R78  240  [0603R]  152.53 116.59 180 top
R79  2K2  [0603R]  136.02 115.82 0 top
R80  22K  [0603R]  12.95 114.81 270 top
R81  2K2  [0603R]  127.89 114.43 270 top
R82  2K2  [0603R]  129.29 114.43 270 top
R83  4.87K  [0603R]  132.08 114.43 90 top
R84  47K  [0603R]  12.19 112.27 180 top
R85  10K  [0603R]  85.85 111.51 270 top
R86  22  [0603R]  125.09 111.12 0 top
R87  1M  [0603R]  28.57 110.74 180 top
R88  0  [0603R]  34.8 110.74 0 top
R89  50  [0603R]  136.78 110.74 0 top
R90  10K  [0603R]  74.8 110.62 180 top
R91  0  [0603R]  77.85 110.62 0 top
R92  10K  [0603R]  82.04 110.62 180 top
R93  22  [0603R]  125.09 109.86 0 top
R94  10K  [0603R]  19.05 109.6 90 top
R95  0  [0603R]  34.8 109.35 0 top
R96  330  [0603R]  8.13 109.22 0 top
R97  50  [0603R]  136.78 109.09 0 top
R98  12K[1%]  [0603R]  23.37 108.58 0 top
R99  22  [0603R]  125.09 108.58 0 top
R100  0  [0603R]  34.8 108.08 0 top
R101  22  [0603R]  125.09 107.31 0 top
R102  0  [0603R]  34.8 106.81 0 top
R103  820  [0603R]  23.37 106.55 180 top
R104  22  [0603R]  125.09 106.05 0 top
R105  22K  [0603R]  12.19 105.66 0 top
R106  0  [0603R]  34.8 105.54 0 top
R107  0  [0603R]  88.52 104.27 0 top
R108  47K  [0603R]  12.19 104.14 0 top
R109  0  [0603R]  34.8 104.14 0 top
R110  4K7  [0603R]  18.41 104.01 0 top
R111  [N_A]  [0603R]  124.59 103.89 90 top
R112  22  [0603R]  125.86 103.89 270 top
R113  [N_A]  [0603R]  128.02 103.89 90 top
R114  50  [0603R]  136.65 103.12 0 top
R115  0  [0603R]  34.8 102.87 0 top
R116  10K  [0603R]  88.52 102.74 0 top
R117  0  [0603R]  8.13 102.62 0 top
R118  330  [0603R]  12.19 102.62 0 top
R119  0  [0603R]  34.8 101.47 0 top
R120  50  [0603R]  136.65 101.47 0 top
R121  0  [0603R]  22.86 100.33 90 top
R122  3K3  [0603R]  24.13 100.33 90 top
R123  0  [0603R]  25.65 100.33 270 top
R124  0  [0603R]  27.18 100.33 270 top
R125  0  [0603R]  28.7 100.33 270 top
R126  33  [0603R]  29.97 100.33 270 top
R127  1K  [0603R]  20.7 99.44 90 top
R128  4K7  [0603R]  18.29 98.68 180 top
R129  10K  [0603R]  11.68 98.04 270 top
R130  0  [0603R]  13.21 98.04 90 top
R131  240  [0603R]  153.92 97.03 180 top
R132  0  [0603R]  12.19 91.44 180 top
R133  620  [0603R]  8.13 89.92 0 top
R134  47K  [0603R]  12.19 89.79 180 top
R135  330  [0603R]  12.19 87.88 0 top
R136  [N_A]  [0603R]  144.4 86.49 90 top
R137  [N_A]  [0603R]  145.8 86.49 90 top
R138  47K  [0603R]  8.13 81.28 0 top
R139  22K  [0603R]  12.19 81.28 180 top
R140  [N_A]  [0603R]  144.4 79.76 270 top
R141  [N_A]  [0603R]  145.8 79.76 90 top
R142  820  [0603R]  12.19 77.72 0 top
R143  [N_A]  [0603R]  145.03 73.41 180 top
R144  [N_A]  [0603R]  145.03 72.01 180 top
R145  10K  [0603R]  145.03 70.48 0 top
R146  10K  [0603R]  68.96 70.36 270 top
R147  0  [0603R]  70.36 70.36 270 top
R148  10K  [0603R]  145.29 65.53 0 top
R149  10K  [0603R]  145.29 62.48 0 top
R150  [N_A]  [0603R]  39.78 59.18 180 top
R151  5K6  [0402R]  37.49 58.55 270 top
R152  2K2  [0402R]  40.03 57.91 180 top
R153  0  [0603R]  39.78 56.64 0 top
R154  0  [0603R]  146.81 55.88 0 top
R155  10K[N_A]  [0603R]  138.18 53.85 180 top
R156  100K  [0603R]  31.88 53.21 90 top
R157  47K  [0603R]  138.18 52.32 0 top
R158  47K  [0603R]  138.18 50.8 0 top
R159  10K  [0402R]  35.71 48.59 0 top
R160  47K  [0603R]  138.18 46.74 0 top
R161  47K  [0603R]  138.18 45.21 0 top
R162  47K  [0603R]  138.18 43.69 0 top
R163  10K  [0603R]  138.18 40.13 0 top
R164  120  [0603R]  138.18 38.1 0 top
R165  0  [0603R]  48.39 37.34 270 top
R166  0  [0603R]  15.49 35.56 0 top
R167  [N_A]  [0603R]  60.58 35.31 90 top
R168  0  [0603R]  138.18 34.54 0 top
R169  0  [0603R]  15.49 34.04 0 top
R170  [N_A]  [0603R]  138.18 33.02 0 top
R171  1K5  [0603R]  15.49 32.51 0 top
R172  510  [0402R]  47.75 32 180 top
R173  100K  [0603R]  28.45 31.75 0 top
R174  0  [0603R]  138.18 31.5 0 top
R175  10K  [0402R]  47.75 30.99 180 top
R176  [N_A]  [0603R]  47.62 29.72 180 top
R177  2K2  [0603R]  112.39 29.21 0 top
R178  20  [0603R]  127.51 28.83 0 top
R179  20  [0603R]  127.51 27.43 0 top
R180  0  [0603R]  48.39 26.42 270 top
R181  47K[N_A]  [0402R]  49.78 26.67 90 top
R182  10K[N_A]  [0402R]  53.21 26.54 270 top
R183  [N_A]  [0603R]  148.97 152.15 0 bottom
R184  10K  [0603R]  31.24 26.42 90 top
R185  [N_A]  [0603R]  32.51 26.42 90 top
R186  4K7  [0603R]  37.85 26.42 90 top
R187  4K7  [0603R]  39.37 26.42 90 top
R188  10K  [0603R]  124.33 25.91 0 top
R189  0  [0603R]  127.51 25.91 180 top
R190  1K5  [0603R]  68.58 24.38 0 top
R191  1K5  [0603R]  71.63 24.38 180 top
R192  0  [0603R]  81.79 24.38 0 top
R193  0  [0603R]  119.63 23.24 270 top
R194  [N_A]  [0603R]  122.43 23.24 90 top
R195  0  [0603R]  123.83 23.24 90 top
R196  180  [0402R]  115.82 16.76 270 top
R197  1K  [0402R]  116.97 16.76 270 top
R198  10K  [0603R]  120.4 15.62 270 top
R199  10K  [0603R]  121.79 15.62 90 top
R200  1K  [0603R]  11.68 14.73 270 top
R201  100  [0603R]  14.73 14.73 270 top
R202  100  [0603R]  16.26 14.73 270 top
R203  0  [0603R]  17.78 14.73 90 top
R204  680  [0603R]  20.32 14.73 270 top
R205  [N_A]  [0603R]  22.35 14.73 270 top
R206  680  [0603R]  24.38 14.73 270 top
R207  [N_A]  [0603R]  26.42 14.73 270 top
R208  4K7  [0603R]  38.48 14.73 270 top
R209  2K7  [0603R]  39.88 14.73 90 top
R210  10K[N_A]  [0603R]  67.94 14.73 270 top
R211  10K[N_A]  [0603R]  70.74 14.73 270 top
R212  10K[N_A]  [0603R]  73.53 14.73 270 top
R213  10K[N_A]  [0603R]  76.33 14.73 270 top
R214  10K[N_A]  [0603R]  79.12 14.73 270 top
R215  0  [0603R]  102.62 14.73 270 top
R216  330  [0603R]  55.24 11.05 180 top
R217  220K  [0603R]  58.17 11.05 0 top
R218  100  [0603R]  62.61 11.05 0 top
R219  1K  [0402R]  106.55 8.89 90 top
R220  180  [0402R]  107.57 8.89 90 top
R221  0  [0603R]  115.95 8.89 90 top
R222  0  [0603R]  117.47 8.89 90 top
R223  [N_A]  [0603R]  142.11 3.68 270 top
R224  820  [0603R]  41.4 153.42 180 bottom
R225  0  [0603R]  65.79 152.27 0 bottom
R226  10K  [0402R]  34.92 152.02 270 bottom
R227  33  [0603R]  31.62 152.02 270 bottom
R228  33  [0603R]  29.84 152.02 90 bottom
R229  10K  [0603R]  148.97 150.62 0 bottom
R230  4K7  [0603R]  151.51 149.86 270 bottom
R231  [N_A]  [0603R]  148.97 149.22 180 bottom
R232  33  [0402R]  90.3 148.46 0 bottom
R233  33  [0402R]  90.3 147.19 0 bottom
R234  4K7  [0603R]  152.91 149.86 270 bottom
R235  [N_A]  [0603R]  148.97 146.18 180 bottom
R236  33  [0402R]  90.3 145.92 0 bottom
R237  33  [0603R]  31.62 145.8 90 bottom
R238  33  [0603R]  29.84 145.8 270 bottom
R239  33  [0402R]  90.3 144.65 0 bottom
R240  33  [0402R]  90.3 143.38 0 bottom
R241  33  [0603R]  41.27 142.88 180 bottom
R242  33  [0402R]  90.3 142.24 0 bottom
R243  33  [0603R]  115.44 141.35 0 bottom
R244  33  [0603R]  109.98 140.08 180 bottom
R245  33  [0402R]  90.3 139.7 180 bottom
R246  33  [0402R]  90.3 138.3 180 bottom
R247  33  [0603R]  109.98 137.29 0 bottom
R248  33  [0402R]  90.3 137.16 180 bottom
R249  10K  [0603R]  66.55 137.16 0 bottom
R250  33  [0402R]  90.3 136.02 180 bottom
R251  33  [0402R]  66.67 135.38 0 bottom
R252  33  [0603R]  109.98 134.49 0 bottom
R253  33  [0402R]  66.67 134.11 180 bottom
R254  33  [0402R]  64.01 134.11 0 bottom
R255  33  [0402R]  66.67 132.84 180 bottom
R256  33  [0402R]  64.01 132.84 180 bottom
R257  33  [0402R]  66.67 131.44 180 bottom
R258  33  [0402R]  64.01 131.44 180 bottom
R259  [N_A]  [0603R]  41.4 129.29 0 bottom
R260  0  [0603R]  115.32 128.65 180 bottom
R261  10K  [0603R]  109.98 128.02 180 bottom
R262  33  [0402R]  75.18 126.11 270 bottom
R263  33  [0402R]  73.79 126.11 270 bottom
R264  33  [0402R]  72.39 126.11 270 bottom
R265  33  [0402R]  70.99 126.11 90 bottom
R266  33  [0402R]  68.58 126.11 270 bottom
R267  33  [0402R]  86.23 125.73 270 bottom
R268  33  [0402R]  84.84 125.73 90 bottom
R269  33  [0402R]  83.44 125.73 90 bottom
R270  33  [0402R]  82.04 125.73 90 bottom
R271  33  [0402R]  80.64 125.73 90 bottom
R272  33  [0402R]  73.79 122.81 270 bottom
R273  33  [0402R]  72.39 122.81 270 bottom
R274  33  [0402R]  70.99 122.81 270 bottom
R275  0  [0603R]  109.98 122.43 0 bottom
R276  33  [0402R]  84.84 122.3 270 bottom
R277  33  [0402R]  83.57 122.3 90 bottom
R278  33  [0402R]  82.04 122.3 90 bottom
R279  33  [0402R]  80.64 122.3 90 bottom
R280  33  [0603R]  115.32 120.9 0 bottom
R281  0  [0603R]  109.98 120.9 0 bottom
R282  620  [0603R]  16 109.73 90 bottom
R283  0  [0603R]  8.13 100.58 0 bottom
R284  0  [0603R]  8.13 98.17 0 bottom
R285  10K  [0603R]  75.82 97.03 270 bottom
R286  22  [0603R]  8.13 86.23 0 bottom
R287  0  [0603R]  91.06 84.45 90 bottom
R288  22  [0603R]  8.13 83.82 0 bottom
R289  [N_A]  [0603R]  39.24 34.92 0 bottom
R290  0  [0603R]  52.96 34.67 180 bottom
R291  0  [0603R]  52.96 33.4 180 bottom
R292  100K  [0603R]  39.24 33.4 0 bottom
R293  10K  [0603R]  19.18 33.15 180 bottom
R294  100  [0603R]  21.46 32.51 90 bottom
R295  0  [0603R]  52.96 32.13 180 bottom
R296  36K  [0603R]  19.18 31.88 0 bottom
R297  100K  [0603R]  34.04 29.97 270 bottom
R298  [N_A]  [0603R]  153.29 152.27 0 bottom
R299  510  [0603R]  38.73 90.3 270 top
R300  680  [0603R]  109.22 54.48 180 top
R301  [N_A]  [0603R]  113.03 54.48 180 top
R302  [N_A]  [0603R]  38.61 94.74 270 top
RV1  3386P-103(10K)  [3386P]  34.54 8.13 180 top
SB1  Open  [SB_0603]  70.48 159.77 90 top
SB2  Open  [SB_0603]  64.14 159.64 90 top
SB3  Closed  [SB_0603]  89.66 148.08 270 top
SB4  Closed  [SB_0603]  91.19 148.08 270 top
SB5  Closed  [SB_0603]  108.97 159.38 270 top
SB6  Closed  [SB_0603]  94.23 144.65 180 top
SB7  Closed  [SB_0603]  90.3 140.84 180 top
SB8  Closed  [SB_0603]  94.23 140.84 180 top
SB9  Open  [SB_0603]  90.42 137.92 0 top
SB10  Closed  [SB_0603]  77.98 125.98 270 top
SB11  Closed  [SB_0603]  77.98 122.3 270 top
SB12  Closed  [SB_0603]  11.43 114.81 270 top
SB13  Open  [SB_0603]  14.73 114.81 90 top
SB14  Open  [SB_0603]  17.65 109.6 90 top
SB15  Closed  [SB_0603]  20.57 109.6 90 top
SB16  Closed  [SB_0603]  129.54 103.89 270 top
SB17  Closed  [SB_0603]  128.02 100.84 90 top
SB18  Closed  [SB_0603]  129.54 100.84 90 top
SB19  Open  [SB_0603]  34.42 59.56 0 top
SB20  Closed  [SB_0603]  121.92 15.24 180 bottom
SB21  Closed  [SB_0603]  128.4 15.24 0 bottom
SB22  Closed  [SB_0603]  46.86 146.05 0 bottom
SB23  Open  [SB_0603]  46.86 150.75 180 bottom
SB24  Closed  [SB_0603]  41.27 150.5 0 bottom
SB25  Open  [SB_0603]  83.95 149.48 90 bottom
SB26  Open  [SB_0603]  80.26 149.48 90 bottom
SB27  Open  [SB_0603]  76.96 149.48 90 bottom
SB28  Open  [SB_0603]  73.79 149.48 90 bottom
SB29  Closed  [SB_0603]  46.86 149.22 180 bottom
SB30  Open  [SB_0603]  41.27 148.84 0 bottom
SB31  Open  [SB_0603]  46.86 147.57 0 bottom
SB32  Closed  [SB_0603]  41.27 147.32 0 bottom
SB34  Open  [SB_0603]  41.27 145.8 0 bottom
SB35  Open  [SB_0603]  46.86 144.53 180 bottom
SB36  Open  [SB_0603]  41.27 144.27 0 bottom
SB37  Closed  [SB_0603]  46.86 143 180 bottom
SB38  Open  [SB_0603]  41.27 141.6 180 bottom
SB39  Open  [SB_0603]  46.86 140.84 180 bottom
SB40  Open  [SB_0603]  41.27 139.83 180 bottom
SB41  Closed  [SB_0603]  46.86 139.32 0 bottom
SB42  Open  [SB_0603]  109.98 138.56 180 bottom
SB43  Closed  [SB_0603]  41.27 138.3 180 bottom
SB44  Open  [SB_0603]  46.86 137.79 0 bottom
SB45  Closed  [SB_0603]  115.57 137.44 0 bottom
SB46  Open  [SB_0603]  109.98 135.76 180 bottom
SB47  Open  [SB_0603]  63.88 135.51 180 bottom
SB48  Open  [SB_0603]  115.32 133.22 180 bottom
SB49  Closed  [SB_0603]  115.32 131.7 180 bottom
SB50  Open  [SB_0603]  109.98 130.81 0 bottom
SB51  Open  [SB_0603]  41.4 130.68 0 bottom
SB52  Closed  [SB_0603]  115.32 130.18 180 bottom
SB53  Open  [SB_0603]  46.86 129.54 0 bottom
SB54  Closed  [SB_0603]  109.98 129.29 0 bottom
SB55  Closed  [SB_0603]  46.86 128.02 0 bottom
SB56  Open  [SB_0603]  115.32 127 180 bottom
SB57  Closed  [SB_0603]  115.32 125.48 180 bottom
SB58  Open  [SB_0603]  109.98 125.48 0 bottom
SB59  Open  [SB_0603]  46.74 124.21 180 bottom
SB60  Open  [SB_0603]  115.32 123.95 180 bottom
SB61  Closed  [SB_0603]  109.98 123.95 0 bottom
SB62  Open  [SB_0603]  115.32 122.43 0 bottom
SB63  Closed  [SB_0603]  109.98 119.63 0 bottom
SB64  Open  [SB_0603]  35.31 29.97 90 bottom
SW1  09.03290.01  [SW1_3TH_2R54_10X2R5]  48.26 167.64 0 top
T1  9012  [SOT-23]  18.29 101.35 0 top
T2  9013  [SOT-23]  12.7 83.82 270 top
T3  9013  [SOT-23]  19.05 32 180 top
T4  BSN20  [SOT-23]  149.22 154.69 270 bottom
T5  BSN20  [SOT-23]  153.16 154.81 270 bottom
T6  9013  [SOT-23]  10.16 110.74 270 bottom
T7  9013  [SOT-23]  12.7 103.12 0 bottom
TP1  1V8  [TP]  134.59 149.35 90 top
TP2  Ground  [TP]  48.26 163.83 0 top
TP3  Ground  [TP]  143.76 169.93 0 top
TP4  +3V3  [TP]  33.91 155.45 90 top
TP5  2V8  [TP]  128.09 155.65 90 top
TP6  VREF  [TP]  68.83 149.86 180 top
TP7  mco1  [TP]  154.05 119.38 0 top
TP8  mco1  [TP]  154.05 121.92 0 top
TP9  VDDA  [TP]  66.55 141.1 180 top
TP10  mco1  [TP]  154.05 124.33 0 top
TP11  mco1  [TP]  154.05 126.87 0 top
TP12  25MHz  [TP]  135.38 113.92 0 top
TP13  Ground  [TP]  33.93 92.08 0 top
TP14  5V  [TP]  12.7 65.02 0 top
TP15  mco1  [TP]  62.23 22.35 90 top
TP16  Ground  [TP]  89.41 4.32 0 top
U1  TFDU6300  [IR_VISHAY3]  136.27 169.93 0 top
U2  LD1117STR  [SOT-223]  132.84 155.96 180 top
U3  MT25QL512ABA8ESF-0SIT  [SOIC16W_1R27_10R3X10R33]  30.48 148.34 90 top
U4  STM32F7  [BGA216_0R8_13X13_SKT]  78.41 137.29 270 top
U5  ST3241EBPR  [SSOP28_0R65_10R2X7R8]  31.5 129.54 270 top
U6  DP83848CVV  [LQFP48_0R5_9X9]  128.02 121.79 0 top
U7  STMPS2151STR  [SOT23-5]  18.29 113.54 270 top
U8  USB3300-EZK  [QFN32_0R5_5X5]  28.45 106.05 0 top
U9  PC28F128M29EWLA  [FBGA64_1_11X13]  78.41 102.87 270 top
U10  ESDALC6V1W5  [SOT-353]  125.09 100.71 90 top
U11  STMPS2151STR  [SOT23-5]  10.67 94.49 0 top
U12  ESDALC6V1W5  [SOT-353]  145.29 83.06 0 top
U13  IS42S32800G-6BLI  [FBGA90_0R8_8X13]  91.06 78.74 270 top
U14  IS61WV102416BLL-10MLI  [BGA48_0R75_9X11]  66.04 78.23 270 top
U15  ESDALC6V1W5  [SOT-353]  145.29 76.2 180 top
U16  LD3985M33R  [SOT23-5]  24 71.5 90 top
U17  ST890CDR  [SOIC8_1R27_4R9X6]  35.59 53.21 0 top
U18  LD1086D2M33  [TO263-3]  49.15 53.85 180 top
U19  LD1117S18TR  [SOT-223]  109.86 43.31 180 top
U20  SN65HVD230  [SOIC8_1R27_4R9X6]  132.08 38.1 270 top
U21  STM32F103CBT6  [LQFP48_0R5_9X9]  35.69 33.66 90 top
U22  STM32L152CCT6  [LQFP48_0R5_9X9]  54.48 33.66 90 top
U23  WM8994ECS_R  [BGA72_0R5_4R5X4]  118.11 29.08 90 top
U24  -  [MP34DT01TR]  124.71 15.24 270 top
U25  -  [MP34DT01TR]  4.7 8.26 270 top
X1  25MHz(with socket)  [XTAL_SOCKET]  72.26 154.56 180 top
X2  NX3215SA-32.768KHZ-EXS00A-MU00525  [XTAL_2SM_3R2X1R5]  82.93 154.31 0 top
X3  SM7745HEX-24.0M[N_A]  [OSC_4SM_7X5]  141.6 147.07 0 top
X4  25MHz (with socket)  [XTAL_SOCKET]  140.72 125.22 90 top
X5  24MHz  [XTAL1]  26.04 115.32 180 top
X6  8MHz(12pF)  [XTAL_2SM_12R7X4R7]  35.05 22.23 180 top
Z1  SMAJ5.0A-TR  [SMA]  20.07 47.5 0 top

## Library data of the parts
B1 B2 = PB10
B3 = SW-JOY
BT1 = BAT_2SM_CR1220
C1 C2 C11 C15 C25 C27 C29 C33-C35 C37 C40-C46 C51 C52 C57 C60 C62 C68 C76 C77 C83 C84 C86 C89 C90 C96 C99 C101-C103 C119 C120 C134-C137 C140 C141 C143-C167 C169 C172 C174 C175 = 0603C: signal model: DEFAULT_CAPACITOR_100000pF_1_2
C3 C4 C36 C47 C48 C59 C106 C112 C142 = TAN-A: signal model: DEFAULT_CAPACITOR_4.7e+06pF_1_2
C5 C19 C56 C61 C70 C139 = TAN-A: signal model: DEFAULT_CAPACITOR_1e+07pF_1_2
C6-C10 C12-C14 C18 C24 C26 C28 C49 C50 C53 C55 C100 C104 C127 = 0603C
C16 = 0603C: signal model: DEFAULT_CAPACITOR_1000pF_1_2
C17 C91-C95 = 0603C: signal model: DEFAULT_CAPACITOR_10000pF_1_2
C20 C23 C80 C81 = 0603C: signal model: DEFAULT_CAPACITOR_20pF_1_2
C21 C22 = 0603C: signal model: DEFAULT_CAPACITOR_10pF_1_2
C30 C31 = 0603C: signal model: DEFAULT_CAPACITOR_22pF_1_2
C32 C138 = 1206C: signal model: DEFAULT_CAPACITOR_2.2e+06pF_2_1
C38 C39 = 0603C: signal model: DEFAULT_CAPACITOR_33pF_1_2
C54 = CAE_5R3X5R3_H5R4: signal model: DEFAULT_CAPACITOR_4.7e+07pF_2_1
C58 = C310M-6: signal model: DEFAULT_CAPACITOR_2.2e+08pF_1_2
C63 C65 C66 C72 C74 C85 C88 C98 = 0603C: signal model: DEFAULT_CAPACITOR_4.7e+06pF_1_2
C64 C67 C69 C87 = 0603C: signal model: DEFAULT_CAPACITOR_1e+06pF_1_2
C71 C73 C75 = 0603C: signal model: DEFAULT_CAPACITOR_2.2e+06pF_1_2
C78 C107-C110 C113-C118 C121-C126 C128-C133 C168 C170 C171 C173 C176 = 0402C: signal model: DEFAULT_CAPACITOR_100000pF_1_2
C79 = 0402C
C82 C105 C111 = TAN-A: signal model: DEFAULT_CAPACITOR_1e+06pF_1_2
C97 = 0603C: signal model: DEFAULT_CAPACITOR_30pF_1_2
CN1 = IDC34S
CN2 = SSM-104-L-DH
CN3 CN23 JP1-JP3 JP8 JP10 JP12 JP15 JP16 = SIP2
CN4 = CLM-120-02-L-D
CN5 CN6 = FTR-130-53-L-D-LC
CN7 CN22 = DB9_M
CN8 CN13 CN14 = MOLEX_47590001
CN9 = RJ45_J0011D01BNL
CN10 CN11 = FTR-120-53-L-D-LC
CN12 = FTSH-110-01-L-DV
CN15 = IDC20S
CN16 = MSD_PJS008_
CN17 = PWR_JACK_DC10
CN18 CN19 = HDR_2X3-1_2R54-6
CN20 = FTSH-125-01-F-DV
CN21 = USB-B
CN24 CN27 = COUPON
CN25 CN26 = PJ3028B
CN28 = CONN_DLR11H0
D1 D2 D7-D12 D15 D16 = SOD-323
D3 = BGA4_0R4_0R8X0R8
D4 = BGA4_0R4_1X1
D5 D6 = BGA11_0R5_1R57X2R07
D13 = TYCO_ZEN056V130A24LS
D14 T1-T7 = SOT-23
H1 H2 = HOLE_C9D4R5
JP4-JP7 JP9 JP11 JP14 JP17-JP24 = SIP3
JP13 = HDR_2X6_2R54
L1 L2 L4-L7 = 0603L
L3 = BNX001
LD1-LD11 = 0603D
LD12 = LED2_3528
R1 R28 = 0603R: signal model: DEFAULT_RESISTOR_47OHM_1_2
R2 = 0603R: signal model: DEFAULT_RESISTOR_5.1OHM_1_2
R3 R5 R7-R11 R14 R16-R19 R27 R29 R30 R33 R73 R87 R88 R91 R95 R100 R102 R106 R107 R109 R110 R115 R117 R119 R121 R123-R125 R128 R130 R132 R147 R150 R153 R154 R165 R166 R168 R169 R174 R180 R183 R189 R192 R193 R195 R203 R215 R221 R222 R225 R260 R275 R281 R287 R290 R291 R295 = 0603R: signal model: DEFAULT_RESISTOR_0.001OHM_1_2
R4 R20 R74 R85 R90 R92 R94 R116 R129 R145 R146 R148 R149 R155 R163 R184 R188 R198 R199 R210-R214 R229 R249 R261 R285 R293 = 0603R: signal model: DEFAULT_RESISTOR_10000OHM_1_2
R6 = 0603R: signal model: DEFAULT_RESISTOR_150OHM_1_2
R12 R156 R173 R292 R297 = 0603R: signal model: DEFAULT_RESISTOR_100000OHM_1_2
R13 R122 = 0603R: signal model: DEFAULT_RESISTOR_3300OHM_1_2
R15 R164 = 0603R: signal model: DEFAULT_RESISTOR_120OHM_1_2
R21 R105 R111 R113 R127 R136 R137 R139-R141 R143 R144 R170 R194 R259 = 0603R: signal model: 0603R_[n/a]
R22 R24 R26 R41-R43 = 0402R: signal model: DEFAULT_RESISTOR_33OHM_1_2
R23 R32 R36 R38 R40 R217 = 0603R: signal model: DEFAULT_RESISTOR_220000OHM_1_2
R25 R159 R175 R226 = 0402R: signal model: DEFAULT_RESISTOR_10000OHM_1_2
R31 R34 R35 R37 R39 R44 R51-R61 R63-R72 R232 R233 R236 R239 R240 R242 R245 R246 R248 R250 R251 R253-R258 R262-R274 R276-R279 = 0402R: signal model: 0402R_33
R45-R50 R62 R126 R227 R228 R237 R238 R241 R243 R244 R247 R252 R280 = 0603R: signal model: DEFAULT_RESISTOR_33OHM_1_2
R75 R171 R190 R191 = 0603R: signal model: DEFAULT_RESISTOR_1500OHM_1_2
R76 R77 R79 R81 R82 R177 = 0603R: signal model: DEFAULT_RESISTOR_2200OHM_1_2
R78 R131 = 0603R: signal model: DEFAULT_RESISTOR_240OHM_1_2
R80 R98 R167 R176 R185 R200 R223 R231 R235 R289 R298-R302 = 0603R
R83 = 0603R: signal model: DEFAULT_RESISTOR_4870OHM_1_2
R84 R108 R134 R138 R157 R158 R160-R162 = 0603R: signal model: DEFAULT_RESISTOR_47000OHM_1_2
R86 R93 R99 R101 R104 R112 R283 R284 R286 R288 = 0603R: signal model: DEFAULT_RESISTOR_22OHM_1_2
R89 R97 R114 R120 = 0603R: signal model: DEFAULT_RESISTOR_50OHM_1_2
R96 R118 R135 R216 = 0603R: signal model: DEFAULT_RESISTOR_330OHM_1_2
R103 R142 R224 = 0603R: signal model: DEFAULT_RESISTOR_820OHM_1_2
R133 R282 = 0603R: signal model: DEFAULT_RESISTOR_620OHM_1_2
R151 = 0402R: signal model: DEFAULT_RESISTOR_5600OHM_1_2
R152 = 0402R: signal model: DEFAULT_RESISTOR_2400OHM_1_2
R172 = 0402R: signal model: DEFAULT_RESISTOR_510OHM_1_2
R178 R179 = 0603R: signal model: DEFAULT_RESISTOR_20OHM_1_2
R181 R182 = 0402R
R186 R187 R208 R230 R234 = 0603R: signal model: DEFAULT_RESISTOR_4700OHM_1_2
R196 R220 = 0402R: signal model: DEFAULT_RESISTOR_180OHM_1_2
R197 R219 = 0402R: signal model: DEFAULT_RESISTOR_1000OHM_1_2
R201 R202 R218 R294 = 0603R: signal model: DEFAULT_RESISTOR_100OHM_1_2
R204-R206 = 0603R: signal model: DEFAULT_RESISTOR_680OHM_1_2
R207 = 0603R: signal model: DEFAULT_RESISTOR_510OHM_1_2
R209 = 0603R: signal model: DEFAULT_RESISTOR_2700OHM_1_2
R296 = 0603R: signal model: DEFAULT_RESISTOR_36000OHM_1_2
RV1 = 3386P
SB1-SB32 SB34-SB64 = SB_0603
SW1 = SW1_3TH_2R54_10X2R5
TP1-TP16 = TP
U1 = IR_VISHAY3
U2 U19 = SOT-223
U3 = SOIC16W_1R27_10R3X10R33
U4 = BGA216_0R8_13X13_SKT
U5 = SSOP28_0R65_10R2X7R8
U6 U21 U22 = LQFP48_0R5_9X9
U7 U11 U16 = SOT23-5
U8 = QFN32_0R5_5X5
U9 = FBGA64_1_11X13
U10 U12 U15 = SOT-353
U13 = FBGA90_0R8_8X13
U14 = BGA48_0R75_9X11
U17 U20 = SOIC8_1R27_4R9X6
U18 = TO263-3
U23 = BGA72_0R5_4R5X4
U24 U25 = MP34DT01TR
X1 X4 = XTAL_SOCKET
X2 = XTAL_2SM_3R2X1R5
X3 = OSC_4SM_7X5
X5 = XTAL1
X6 = XTAL_2SM_12R7X4R7
Z1 = SMA

## Footprints (pads in the part's own frame, mm; a bottom-side part is the same pattern mirrored in y, then rotated)
0402C
  rect 0.559x0.559 smd: 1(-0.508,0) 2(0.508,0)
0402R
  rect 0.559x0.559 smd: 1(-0.508,0) 2(0.508,0)
0603C
  rect 0.889x0.813 smd: 1(-0.762,0) 2(0.762,0)
0603D
  rect 0.889x0.813 smd: 1(-0.762,0) 2(0.762,0)
0603L
  rect 0.889x0.813 smd: 1(-0.762,0) 2(0.762,0)
0603R
  rect 0.787x0.813 smd: 1(-0.762,0) 2(0.762,0)
1206C
  rect 1.168x1.524 smd: 1(-1.473,0) 2(1.473,0)
3386P
  rect 1.168x1.168 hole 0.762: 1(-2.54,0)
  round 1.168 hole 0.762: 2(0,2.54) 3(2.54,0)
BAT_2SM_CR1220
  round 1.473 hole 1.473 unplated: (-3.75,0)
  round 1.194 hole 1.194 unplated: (3.75,0)
  rect 4.064x2.159 smd: 1(-7.95,0) 2(7.95,0)
BGA4_0R4_0R8X0R8
  round 0.203 smd: A1(-0.2,0.2) A2(0.2,0.2) B1(-0.2,-0.2) B2(0.2,-0.2)
BGA4_0R4_1X1
  round 0.203 smd: A1(-0.2,0.2) A2(0.2,0.2) B1(-0.2,-0.2) B2(0.2,-0.2)
BGA11_0R5_1R57X2R07
  round 0.249 smd: A2(0,0.75) A3(0.5,0.75) B1(-0.5,0.25) B2(0,0.25) B3(0.5,0.25) C1(-0.5,-0.25) C2(0,-0.25) C3(0.5,-0.25) D1(-0.5,-0.75) D2(0,-0.75) D3(0.5,-0.75)
BGA48_0R75_9X11
  round 0.356 smd: A1(-1.875,2.625) A2(-1.125,2.625) A3(-0.375,2.625) A4(0.375,2.625) A5(1.125,2.625) A6(1.875,2.625) B1(-1.875,1.875) B2(-1.125,1.875) B3(-0.375,1.875) B4(0.375,1.875) B5(1.125,1.875) B6(1.875,1.875) C1(-1.875,1.125) C2(-1.125,1.125) C3(-0.375,1.125) C4(0.375,1.125) C5(1.125,1.125) C6(1.875,1.125) D1(-1.875,0.375) D2(-1.125,0.375) D3(-0.375,0.375) D4(0.375,0.375) D5(1.125,0.375) D6(1.875,0.375) E1(-1.875,-0.375) E2(-1.125,-0.375) E3(-0.375,-0.375) E4(0.375,-0.375) E5(1.125,-0.375) E6(1.875,-0.375) F1(-1.875,-1.125) F2(-1.125,-1.125) F3(-0.375,-1.125) F4(0.375,-1.125) F5(1.125,-1.125) F6(1.875,-1.125) G1(-1.875,-1.875) G2(-1.125,-1.875) G3(-0.375,-1.875) G4(0.375,-1.875) G5(1.125,-1.875) G6(1.875,-1.875) H1(-1.875,-2.625) H2(-1.125,-2.625) H3(-0.375,-2.625) H4(0.375,-2.625) H5(1.125,-2.625) H6(1.875,-2.625)
BGA72_0R5_4R5X4
  round 0.249 smd: A1(-2,1.75) A2(-1.5,1.75) A3(-1,1.75) A4(-0.5,1.75) A5(0,1.75) A6(0.5,1.75) A7(1,1.75) A8(1.5,1.75) A9(2,1.75) B1(-2,1.25) B2(-1.5,1.25) B3(-1,1.25) B4(-0.5,1.25) B5(0,1.25) B6(0.5,1.25) B7(1,1.25) B8(1.5,1.25) B9(2,1.25) C1(-2,0.75) C2(-1.5,0.75) C3(-1,0.75) C4(-0.5,0.75) C5(0,0.75) C6(0.5,0.75) C7(1,0.75) C8(1.5,0.75) C9(2,0.75) D1(-2,0.25) D2(-1.5,0.25) D3(-1,0.25) D4(-0.5,0.25) D5(0,0.25) D6(0.5,0.25) D7(1,0.25) D8(1.5,0.25) D9(2,0.25) E1(-2,-0.25) E2(-1.5,-0.25) E3(-1,-0.25) E4(-0.5,-0.25) E5(0,-0.25) E6(0.5,-0.25) E7(1,-0.25) E8(1.5,-0.25) E9(2,-0.25) F1(-2,-0.75) F2(-1.5,-0.75) F3(-1,-0.75) F4(-0.5,-0.75) F5(0,-0.75) F6(0.5,-0.75) F7(1,-0.75) F8(1.5,-0.75) F9(2,-0.75) G1(-2,-1.25) G2(-1.5,-1.25) G3(-1,-1.25) G4(-0.5,-1.25) G5(0,-1.25) G6(0.5,-1.25) G7(1,-1.25) G8(1.5,-1.25) G9(2,-1.25) H1(-2,-1.75) H2(-1.5,-1.75) H3(-1,-1.75) H4(-0.5,-1.75) H5(0,-1.75) H6(0.5,-1.75) H7(1,-1.75) H8(1.5,-1.75) H9(2,-1.75)
BGA216_0R8_13X13_SKT
  round 1.702 hole 1.702 unplated: (-8.237,7.863) (-8.237,-7.863) (7.487,7.863) (7.487,-7.863)
  round 0.85 hole 0.85 unplated: (-8.237,-2.783) (7.487,5.323)
  round 0.406 smd: A1(-5.6,5.6) A2(-4.8,5.6) A3(-4,5.6) A4(-3.2,5.6) A5(-2.4,5.6) A6(-1.6,5.6) A7(-0.8,5.6) A8(0,5.6) A9(0.8,5.6) A10(1.6,5.6) A11(2.4,5.6) A12(3.2,5.6) A13(4,5.6) A14(4.8,5.6) A15(5.6,5.6) B1(-5.6,4.8) B2(-4.8,4.8) B3(-4,4.8) B4(-3.2,4.8) B5(-2.4,4.8) B6(-1.6,4.8) B7(-0.8,4.8) B8(0,4.8) B9(0.8,4.8) B10(1.6,4.8) B11(2.4,4.8) B12(3.2,4.8) B13(4,4.8) B14(4.8,4.8) B15(5.6,4.8) C1(-5.6,4) C2(-4.8,4) C3(-4,4) C4(-3.2,4) C5(-2.4,4) C6(-1.6,4) C7(-0.8,4) C8(0,4) C9(0.8,4) C10(1.6,4) C11(2.4,4) C12(3.2,4) C13(4,4) C14(4.8,4) C15(5.6,4) D1(-5.6,3.2) D2(-4.8,3.2) D3(-4,3.2) D4(-3.2,3.2) D5(-2.4,3.2) D6(-1.6,3.2) D7(-0.8,3.2) D8(0,3.2) D9(0.8,3.2) D10(1.6,3.2) D11(2.4,3.2) D12(3.2,3.2) D13(4,3.2) D14(4.8,3.2) D15(5.6,3.2) E1(-5.6,2.4) E2(-4.8,2.4) E3(-4,2.4) E4(-3.2,2.4) E5(-2.4,2.4) E6(-1.6,2.4) E7(-0.8,2.4) E8(0,2.4) E9(0.8,2.4) E10(1.6,2.4) E11(2.4,2.4) E12(3.2,2.4) E13(4,2.4) E14(4.8,2.4) E15(5.6,2.4) F1(-5.6,1.6) F2(-4.8,1.6) F3(-4,1.6) F4(-3.2,1.6) F5(-2.4,1.6) F6(-1.6,1.6) F7(-0.8,1.6) F8(0,1.6) F9(0.8,1.6) F10(1.6,1.6) F11(2.4,1.6) F12(3.2,1.6) F13(4,1.6) F14(4.8,1.6) F15(5.6,1.6) G1(-5.6,0.8) G2(-4.8,0.8) G3(-4,0.8) G4(-3.2,0.8) G5(-2.4,0.8) G6(-1.6,0.8) G10(1.6,0.8) G11(2.4,0.8) G12(3.2,0.8) G13(4,0.8) G14(4.8,0.8) G15(5.6,0.8) H1(-5.6,0) H2(-4.8,0) H3(-4,0) H4(-3.2,0) H5(-2.4,0) H6(-1.6,0) H10(1.6,0) H11(2.4,0) H12(3.2,0) H13(4,0) H14(4.8,0) H15(5.6,0) J1(-5.6,-0.8) J2(-4.8,-0.8) J3(-4,-0.8) J4(-3.2,-0.8) J5(-2.4,-0.8) J6(-1.6,-0.8) J10(1.6,-0.8) J11(2.4,-0.8) J12(3.2,-0.8) J13(4,-0.8) J14(4.8,-0.8) J15(5.6,-0.8) K1(-5.6,-1.6) K2(-4.8,-1.6) K3(-4,-1.6) K4(-3.2,-1.6) K5(-2.4,-1.6) K6(-1.6,-1.6) K7(-0.8,-1.6) K8(0,-1.6) K9(0.8,-1.6) K10(1.6,-1.6) K11(2.4,-1.6) K12(3.2,-1.6) K13(4,-1.6) K14(4.8,-1.6) K15(5.6,-1.6) L1(-5.6,-2.4) L2(-4.8,-2.4) L3(-4,-2.4) L4(-3.2,-2.4) L5(-2.4,-2.4) L6(-1.6,-2.4) L7(-0.8,-2.4) L8(0,-2.4) L9(0.8,-2.4) L10(1.6,-2.4) L11(2.4,-2.4) L12(3.2,-2.4) L13(4,-2.4) L14(4.8,-2.4) L15(5.6,-2.4) M1(-5.6,-3.2) M2(-4.8,-3.2) M3(-4,-3.2) M4(-3.2,-3.2) M5(-2.4,-3.2) M6(-1.6,-3.2) M7(-0.8,-3.2) M8(0,-3.2) M9(0.8,-3.2) M10(1.6,-3.2) M11(2.4,-3.2) M12(3.2,-3.2) M13(4,-3.2) M14(4.8,-3.2) M15(5.6,-3.2) N1(-5.6,-4) N2(-4.8,-4) N3(-4,-4) N4(-3.2,-4) N5(-2.4,-4) N6(-1.6,-4) N7(-0.8,-4) N8(0,-4) N9(0.8,-4) N10(1.6,-4) N11(2.4,-4) N12(3.2,-4) N13(4,-4) N14(4.8,-4) N15(5.6,-4) P1(-5.6,-4.8) P2(-4.8,-4.8) P3(-4,-4.8) P4(-3.2,-4.8) P5(-2.4,-4.8) P6(-1.6,-4.8) P7(-0.8,-4.8) P8(0,-4.8) P9(0.8,-4.8) P10(1.6,-4.8) P11(2.4,-4.8) P12(3.2,-4.8) P13(4,-4.8) P14(4.8,-4.8) P15(5.6,-4.8) R1(-5.6,-5.6) R2(-4.8,-5.6) R3(-4,-5.6) R4(-3.2,-5.6) R5(-2.4,-5.6) R6(-1.6,-5.6) R7(-0.8,-5.6) R8(0,-5.6) R9(0.8,-5.6) R10(1.6,-5.6) R11(2.4,-5.6) R12(3.2,-5.6) R13(4,-5.6) R14(4.8,-5.6) R15(5.6,-5.6)
BNX001
  round 1.981 hole 1.219: 1(2.5,2.5) 2(-2.5,2.5) 3(2.5,-2.5) 4(0,0) 5(5,0) 6(-2.5,-2.5)
C310M-6
  rect 5.08x3.048 smd: 1(3.175,0) 2(-3.175,0)
CAE_5R3X5R3_H5R4
  rect 2.718x1.168 smd: 1(-2.05,0) 2(2.05,0)
